# Altium PCB Switch_Matrix_32_2.PCBDOC (part 8 of 9)
Units mm, origin at the board's own origin, x right, y up, seen from the top; angles counter-clockwise.
Board outline 222.54 x 100 mm, 6 copper layers (L1, P2, L3, P4, L5, L6), stack 1.61 mm thick; 629 components, 583 nets, 2332 pads, 825 vias.
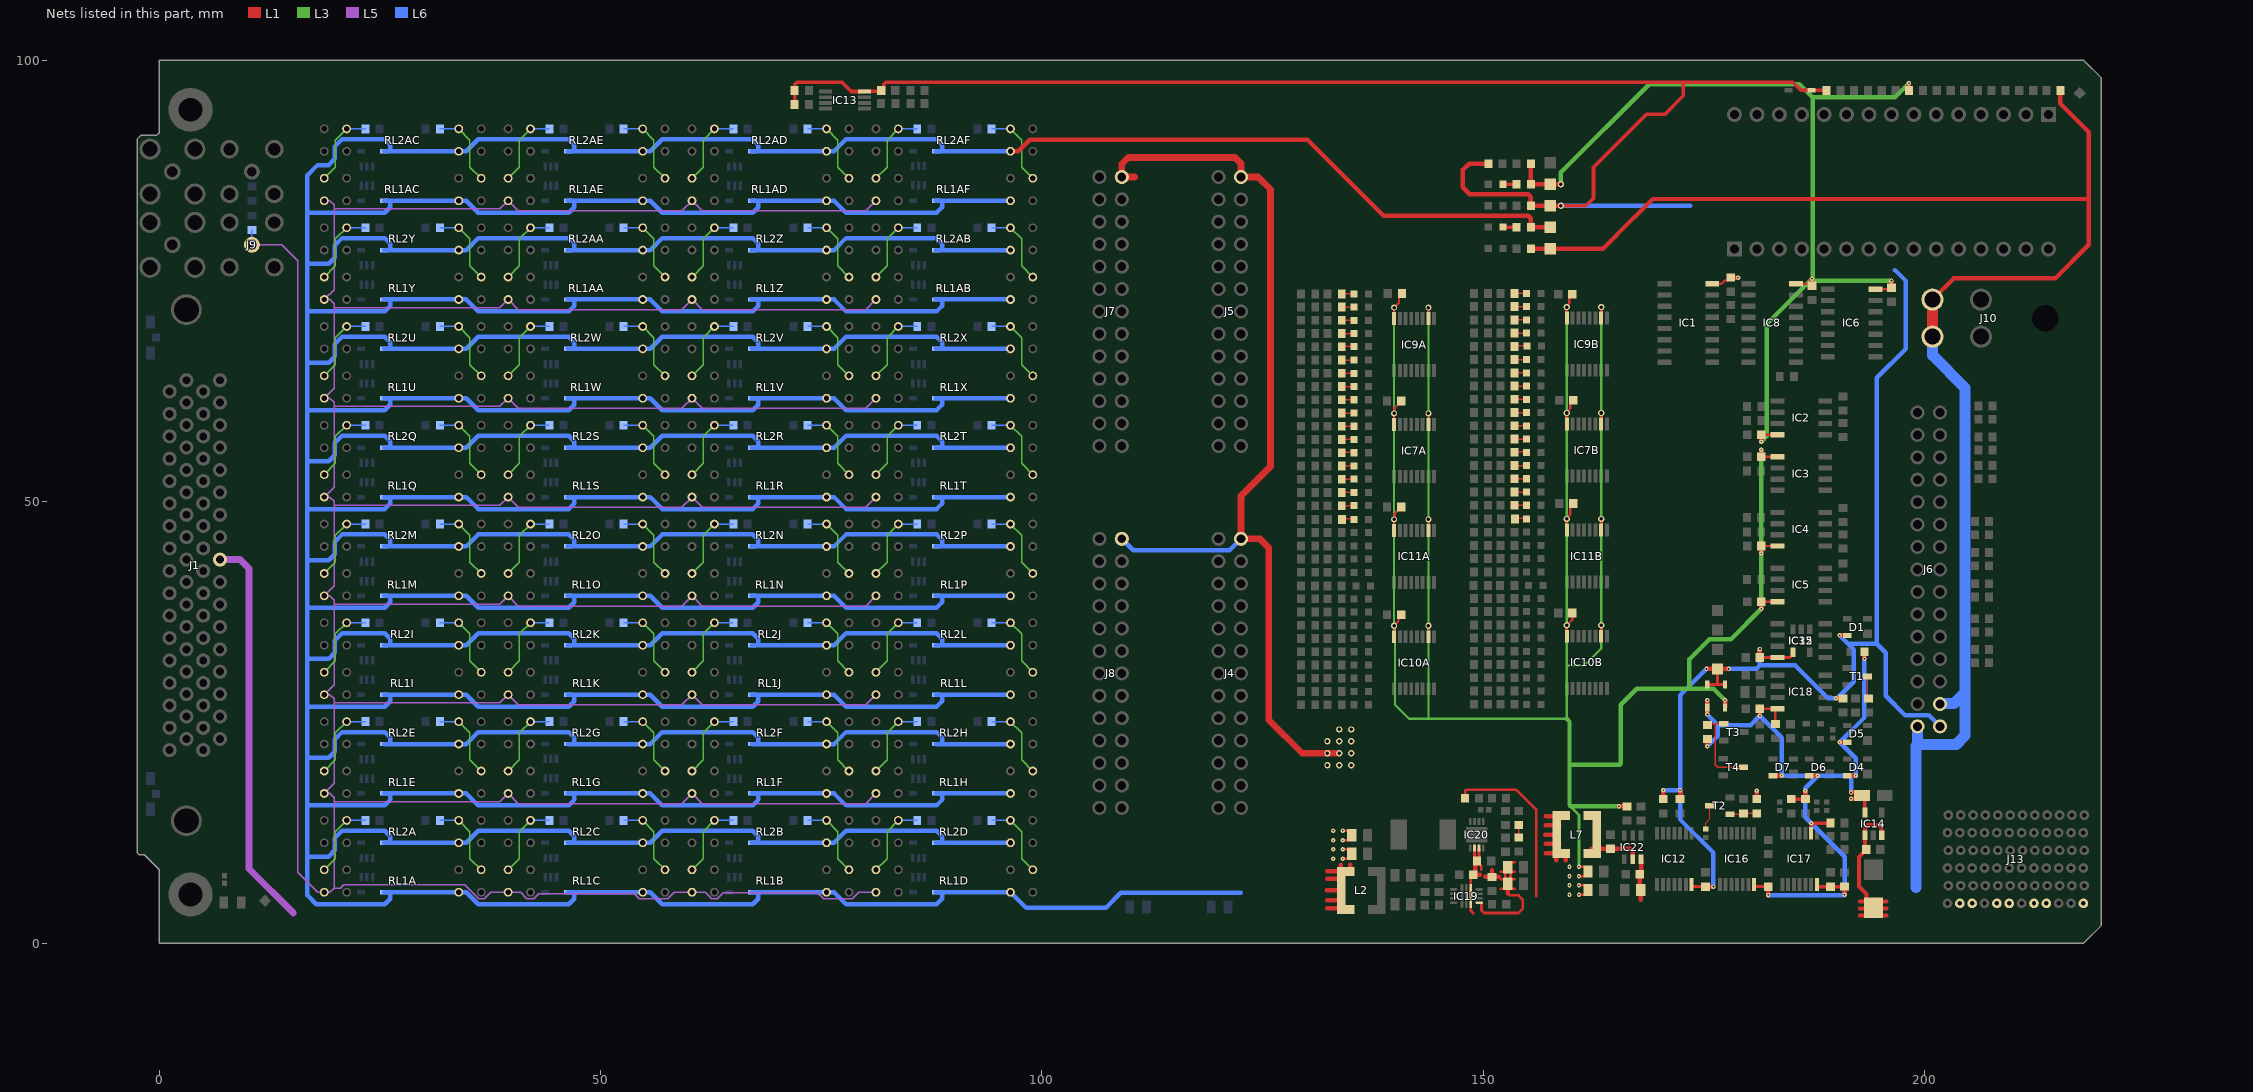
[diagram p11: the nets of this part, all layers, seen from the top]

## Via types
v1: diameter 0.5, hole 0.2, L1 to L6, tented both sides, 775 vias
v2: diameter 0.7, hole 0.4, L1 to L6, tented both sides, 41 vias
v3: diameter 0.5, hole 0.2, L1 to L6, 5 vias
v4: diameter 0.6, hole 0.3, L1 to L6, tented both sides, 4 vias

## Nets (pads, with @x,y where several pads share a name; then routed paths per layer and width w, separated by ;. In a path a pad name is that pad's centre, name@x,y a point inside that pad or via, vN(x,y) a via of type N, cw(c..) or ccw(c..) an arc to the next point about the centre after c; other vN are vias at no path point) (continued)
NetLD19A_2: LD19A.2 R32A.2 | length 1.4
  L1 w0.152: R32A.2@133.975,48.05 LD19A.2@135.35,48.05
NetLD19B_2: LD19B.2 R32B.2 | length 1.4
  L1 w0.152: R32B.2@153.55,48.1 LD19B.2@154.925,48.1
NetLD20A_2: LD20A.2 R34A.2 | length 1.4
  L1 w0.152: R34A.2@133.975,49.55 LD20A.2@135.35,49.55
NetLD20B_2: LD20B.2 R34B.2 | length 1.4
  L1 w0.152: R34B.2@153.55,49.6 LD20B.2@154.925,49.6
NetLD21A_2: LD21A.2 R36A.2 | length 1.4
  L1 w0.152: R36A.2@133.975,51.05 LD21A.2@135.35,51.05
NetLD21B_2: LD21B.2 R36B.2 | length 1.4
  L1 w0.152: R36B.2@153.55,51.1 LD21B.2@154.925,51.1
NetLD22A_2: LD22A.2 R38A.2 | length 1.4
  L1 w0.152: R38A.2@133.975,52.55 LD22A.2@135.35,52.55
NetLD22B_2: LD22B.2 R38B.2 | length 1.4
  L1 w0.152: R38B.2@153.55,52.6 LD22B.2@154.925,52.6
NetLD23A_2: LD23A.2 R40A.2 | length 1.4
  L1 w0.152: R40A.2@133.975,54.05 LD23A.2@135.35,54.05
NetLD23B_2: LD23B.2 R40B.2 | length 1.4
  L1 w0.152: R40B.2@153.55,54.1 LD23B.2@154.925,54.1
NetLD24A_2: LD24A.2 R42A.2 | length 1.4
  L1 w0.152: R42A.2@133.975,55.55 134.025,55.6 LD24A.2@135.375,55.6
NetLD24B_2: LD24B.2 R42B.2 | length 1.4
  L1 w0.152: R42B.2@153.55,55.6 153.6,55.65 LD24B.2@154.95,55.65
NetLD25A_2: LD25A.2 R44A.2 | length 1.4
  L1 w0.152: R44A.2@133.975,57.05 LD25A.2@135.35,57.05
NetLD25B_2: LD25B.2 R44B.2 | length 1.4
  L1 w0.152: R44B.2@153.55,57.1 LD25B.2@154.925,57.1
NetLD26A_2: LD26A.2 R46A.2 | length 1.4
  L1 w0.152: R46A.2@133.975,58.55 LD26A.2@135.35,58.55
NetLD26B_2: LD26B.2 R46B.2 | length 1.4
  L1 w0.152: R46B.2@153.55,58.6 LD26B.2@154.925,58.6
NetLD27A_2: LD27A.2 R48A.2 | length 1.4
  L1 w0.152: R48A.2@133.975,60.05 LD27A.2@135.35,60.05
NetLD27B_2: LD27B.2 R48B.2 | length 1.4
  L1 w0.152: R48B.2@153.55,60.1 LD27B.2@154.925,60.1
NetLD28A_2: LD28A.2 R50A.2 | length 1.4
  L1 w0.152: R50A.2@133.975,61.55 LD28A.2@135.35,61.55
NetLD28B_2: LD28B.2 R50B.2 | length 1.4
  L1 w0.152: R50B.2@153.55,61.6 LD28B.2@154.925,61.6
NetLD29A_2: LD29A.2 R52A.2 | length 1.4
  L1 w0.152: R52A.2@133.975,63.05 LD29A.2@135.35,63.05
NetLD29B_2: LD29B.2 R52B.2 | length 1.4
  L1 w0.152: R52B.2@153.55,63.1 LD29B.2@154.925,63.1
NetLD30A_2: LD30A.2 R54A.2 | length 1.4
  L1 w0.152: R54A.2@133.975,64.55 LD30A.2@135.35,64.55
NetLD30B_2: LD30B.2 R54B.2 | length 1.4
  L1 w0.152: R54B.2@153.55,64.6 LD30B.2@154.925,64.6
NetLD31A_2: LD31A.2 R57A.2 | length 1.4
  L1 w0.152: R57A.2@133.975,66.05 LD31A.2@135.35,66.05
NetLD31B_2: LD31B.2 R57B.2 | length 1.4
  L1 w0.152: R57B.2@153.55,66.1 LD31B.2@154.925,66.1
NetLD32A_2: LD32A.2 R59A.2 | length 1.4
  L1 w0.152: R59A.2@133.975,67.55 134.025,67.6 LD32A.2@135.375,67.6
NetLD32B_2: LD32B.2 R59B.2 | length 1.4
  L1 w0.152: R59B.2@153.55,67.6 153.6,67.65 LD32B.2@154.95,67.65
NetLD33A_2: LD33A.2 R61A.2 | length 1.4
  L1 w0.152: R61A.2@133.975,69.05 LD33A.2@135.35,69.05
NetLD33B_2: LD33B.2 R61B.2 | length 1.4
  L1 w0.152: R61B.2@153.55,69.1 LD33B.2@154.925,69.1
NetLD34A_2: LD34A.2 R63A.2 | length 1.4
  L1 w0.152: R63A.2@133.975,70.55 LD34A.2@135.35,70.55
NetLD34B_2: LD34B.2 R63B.2 | length 1.4
  L1 w0.152: R63B.2@153.55,70.6 LD34B.2@154.925,70.6
NetLD35A_2: LD35A.2 R65A.2 | length 1.4
  L1 w0.152: R65A.2@133.975,72.05 LD35A.2@135.35,72.05
NetLD35B_2: LD35B.2 R65B.2 | length 1.4
  L1 w0.152: R65B.2@153.55,72.1 LD35B.2@154.925,72.1
NetLD36A_2: LD36A.2 R67A.2 | length 1.4
  L1 w0.152: R67A.2@133.975,73.55 LD36A.2@135.35,73.55
NetLD36B_2: LD36B.2 R67B.2 | length 1.4
  L1 w0.152: R67B.2@153.55,73.6 LD36B.2@154.925,73.6
NetLD37_2: LD37.2 R125.2 | length 1.6
  L1 w0.4: LD37.2@152.225,81.1 R125.2@153.8,81.1
NetLD38_2: LD38.2 R127.2 | length 1.6
  L1 w0.4: LD38.2@152.225,85.967 R127.2@153.8,85.967
NetR85_1: R85.1 T2.3 | length 2.8
  L1 w0.127: R85.1@175.2,12.9 175.2,13.6 175.659,14.059 T2.3@175.659,15.548
NetR98A_2: R98A.2 RL1A.8 RL2A.7 | length 8.8
  L3 w0.152: RL1A.8@18.694,8.3 19.971,9.577 19.971,12.633 RL2A.7@21.234,13.896
  L6 w0.152: RL2A.7@21.234,13.896 R98A.2@23.378,13.896
NetR98AA_2: R98AA.2 RL1AA.8 RL2AA.7 | length 8.8
  L3 w0.152: RL1AA.8@39.53,75.452 40.807,76.729 40.807,79.785 RL2AA.7@42.07,81.048
  L6 w0.152: RL2AA.7@42.07,81.048 R98AA.2@44.214,81.048
NetR98AB_2: R98AB.2 RL1AB.8 RL2AB.7 | length 8.8
  L3 w0.152: RL1AB.8@81.202,75.452 82.479,76.729 82.479,79.785 RL2AB.7@83.742,81.048
  L6 w0.152: RL2AB.7@83.742,81.048 R98AB.2@85.886,81.048
NetR98AC_2: R98AC.2 RL1AC.8 RL2AC.7 | length 8.8
  L3 w0.152: RL1AC.8@18.694,86.644 19.971,87.921 19.971,90.977 RL2AC.7@21.234,92.24
  L6 w0.152: RL2AC.7@21.234,92.24 R98AC.2@23.378,92.24
NetR98AD_2: R98AD.2 RL1AD.8 RL2AD.7 | length 8.8
  L3 w0.152: RL1AD.8@60.366,86.644 61.643,87.921 61.643,90.977 RL2AD.7@62.906,92.24
  L6 w0.152: RL2AD.7@62.906,92.24 R98AD.2@65.05,92.24
NetR98AE_2: R98AE.2 RL1AE.8 RL2AE.7 | length 8.8
  L3 w0.152: RL1AE.8@39.53,86.644 40.807,87.921 40.807,90.977 RL2AE.7@42.07,92.24
  L6 w0.152: RL2AE.7@42.07,92.24 R98AE.2@44.214,92.24
NetR98AF_2: R98AF.2 RL1AF.8 RL2AF.7 | length 8.8
  L3 w0.152: RL1AF.8@81.202,86.644 82.479,87.921 82.479,90.977 RL2AF.7@83.742,92.24
  L6 w0.152: RL2AF.7@83.742,92.24 R98AF.2@85.886,92.24
NetR98B_2: R98B.2 RL1B.8 RL2B.7 | length 8.8
  L3 w0.152: RL1B.8@60.366,8.3 61.643,9.577 61.643,12.633 RL2B.7@62.906,13.896
  L6 w0.152: RL2B.7@62.906,13.896 R98B.2@65.05,13.896
NetR98C_2: R98C.2 RL1C.8 RL2C.7 | length 8.8
  L3 w0.152: RL1C.8@39.53,8.3 40.807,9.577 40.807,12.633 RL2C.7@42.07,13.896
  L6 w0.152: RL2C.7@42.07,13.896 R98C.2@44.214,13.896
NetR98D_2: R98D.2 RL1D.8 RL2D.7 | length 8.8
  L3 w0.152: RL1D.8@81.202,8.3 82.479,9.577 82.479,12.633 RL2D.7@83.742,13.896
  L6 w0.152: RL2D.7@83.742,13.896 R98D.2@85.886,13.896
NetR98E_2: R98E.2 RL1E.8 RL2E.7 | length 8.8
  L3 w0.152: RL1E.8@18.694,19.492 19.971,20.769 19.971,23.825 RL2E.7@21.234,25.088
  L6 w0.152: RL2E.7@21.234,25.088 R98E.2@23.378,25.088
NetR98F_2: R98F.2 RL1F.8 RL2F.7 | length 8.8
  L3 w0.152: RL1F.8@60.366,19.492 61.643,20.769 61.643,23.825 RL2F.7@62.906,25.088
  L6 w0.152: RL2F.7@62.906,25.088 R98F.2@65.05,25.088
NetR98G_2: R98G.2 RL1G.8 RL2G.7 | length 8.8
  L3 w0.152: RL1G.8@39.53,19.492 40.807,20.769 40.807,23.825 RL2G.7@42.07,25.088
  L6 w0.152: RL2G.7@42.07,25.088 R98G.2@44.214,25.088
NetR98H_2: R98H.2 RL1H.8 RL2H.7 | length 8.8
  L3 w0.152: RL1H.8@81.202,19.492 82.479,20.769 82.479,23.825 RL2H.7@83.742,25.088
  L6 w0.152: RL2H.7@83.742,25.088 R98H.2@85.886,25.088
NetR98I_2: R98I.2 RL1I.8 RL2I.7 | length 8.8
  L3 w0.152: RL1I.8@18.694,30.684 19.971,31.961 19.971,35.017 RL2I.7@21.234,36.28
  L6 w0.152: RL2I.7@21.234,36.28 R98I.2@23.378,36.28
NetR98J_2: R98J.2 RL1J.8 RL2J.7 | length 8.8
  L3 w0.152: RL1J.8@60.366,30.684 61.643,31.961 61.643,35.017 RL2J.7@62.906,36.28
  L6 w0.152: RL2J.7@62.906,36.28 R98J.2@65.05,36.28
NetR98K_2: R98K.2 RL1K.8 RL2K.7 | length 8.8
  L3 w0.152: RL1K.8@39.53,30.684 40.807,31.961 40.807,35.017 RL2K.7@42.07,36.28
  L6 w0.152: RL2K.7@42.07,36.28 R98K.2@44.214,36.28
NetR98L_2: R98L.2 RL1L.8 RL2L.7 | length 8.8
  L3 w0.152: RL1L.8@81.202,30.684 82.479,31.961 82.479,35.017 RL2L.7@83.742,36.28
  L6 w0.152: RL2L.7@83.742,36.28 R98L.2@85.886,36.28
NetR98M_2: R98M.2 RL1M.8 RL2M.7 | length 8.8
  L3 w0.152: RL1M.8@18.694,41.876 19.971,43.153 19.971,46.209 RL2M.7@21.234,47.472
  L6 w0.152: RL2M.7@21.234,47.472 22.734,47.472 R98M.2@23.378,47.472
NetR98N_2: R98N.2 RL1N.8 RL2N.7 | length 8.8
  L3 w0.152: RL1N.8@60.366,41.876 61.643,43.153 61.643,46.209 RL2N.7@62.906,47.472
  L6 w0.152: RL2N.7@62.906,47.472 R98N.2@65.05,47.472
NetR98O_2: R98O.2 RL1O.8 RL2O.7 | length 8.8
  L3 w0.152: RL1O.8@39.53,41.876 40.807,43.153 40.807,46.209 RL2O.7@42.07,47.472
  L6 w0.152: RL2O.7@42.07,47.472 R98O.2@44.214,47.472
NetR98P_2: R98P.2 RL1P.8 RL2P.7 | length 8.8
  L3 w0.152: RL1P.8@81.202,41.876 82.479,43.153 82.479,46.209 RL2P.7@83.742,47.472
  L6 w0.152: RL2P.7@83.742,47.472 R98P.2@85.886,47.472
NetR98Q_2: R98Q.2 RL1Q.8 RL2Q.7 | length 8.8
  L3 w0.152: RL1Q.8@18.694,53.068 19.971,54.345 19.971,57.401 RL2Q.7@21.234,58.664
  L6 w0.152: RL2Q.7@21.234,58.664 R98Q.2@23.378,58.664
NetR98R_2: R98R.2 RL1R.8 RL2R.7 | length 8.8
  L3 w0.152: RL1R.8@60.366,53.068 61.643,54.345 61.643,57.401 RL2R.7@62.906,58.664
  L6 w0.152: RL2R.7@62.906,58.664 R98R.2@65.05,58.664
NetR98S_2: R98S.2 RL1S.8 RL2S.7 | length 8.8
  L3 w0.152: RL1S.8@39.53,53.068 40.807,54.345 40.807,57.401 RL2S.7@42.07,58.664
  L6 w0.152: RL2S.7@42.07,58.664 R98S.2@44.214,58.664
NetR98T_2: R98T.2 RL1T.8 RL2T.7 | length 8.8
  L3 w0.152: RL1T.8@81.202,53.068 82.479,54.345 82.479,57.401 RL2T.7@83.742,58.664
  L6 w0.152: RL2T.7@83.742,58.664 R98T.2@85.886,58.664
NetR98U_2: R98U.2 RL1U.8 RL2U.7 | length 8.8
  L3 w0.152: RL1U.8@18.694,64.26 19.971,65.537 19.971,68.593 RL2U.7@21.234,69.856
  L6 w0.152: RL2U.7@21.234,69.856 R98U.2@23.378,69.856
NetR98V_2: R98V.2 RL1V.8 RL2V.7 | length 8.8
  L3 w0.152: RL1V.8@60.366,64.26 61.643,65.537 61.643,68.593 RL2V.7@62.906,69.856
  L6 w0.152: RL2V.7@62.906,69.856 R98V.2@65.05,69.856
NetR98W_2: R98W.2 RL1W.8 RL2W.7 | length 8.8
  L3 w0.152: RL1W.8@39.53,64.26 40.807,65.537 40.807,68.593 RL2W.7@42.07,69.856
  L6 w0.152: RL2W.7@42.07,69.856 R98W.2@44.214,69.856
NetR98X_2: R98X.2 RL1X.8 RL2X.7 | length 8.8
  L3 w0.152: RL1X.8@81.202,64.26 82.479,65.537 82.479,68.593 RL2X.7@83.742,69.856
  L6 w0.152: RL2X.7@83.742,69.856 R98X.2@85.886,69.856
NetR98Y_2: R98Y.2 RL1Y.8 RL2Y.7 | length 8.8
  L3 w0.152: RL1Y.8@18.694,75.452 19.971,76.729 19.971,79.785 RL2Y.7@21.234,81.048
  L6 w0.152: RL2Y.7@21.234,81.048 R98Y.2@23.378,81.048
NetR98Z_2: R98Z.2 RL1Z.8 RL2Z.7 | length 8.8
  L3 w0.152: RL1Z.8@60.366,75.452 61.643,76.729 61.643,79.785 RL2Z.7@62.906,81.048
  L6 w0.152: RL2Z.7@62.906,81.048 R98Z.2@65.05,81.048
NetR99A_2: R99A.2 RL1A.5 RL2A.6 | length 8.8
  L3 w0.152: RL2A.6@33.934,13.896 35.197,12.633 35.197,9.577 RL1A.5@36.474,8.3
  L6 w0.152: R99A.2@31.79,13.896 RL2A.6@33.934,13.896
NetR99AA_2: R99AA.2 RL1AA.5 RL2AA.6 | length 8.8
  L3 w0.152: RL2AA.6@54.77,81.048 56.033,79.785 56.033,76.729 RL1AA.5@57.31,75.452
  L6 w0.152: R99AA.2@52.626,81.048 RL2AA.6@54.77,81.048
NetR99AB_2: R99AB.2 RL1AB.5 RL2AB.6 | length 8.8
  L3 w0.152: RL2AB.6@96.442,81.048 97.705,79.785 97.705,76.729 RL1AB.5@98.982,75.452
  L6 w0.152: R99AB.2@94.298,81.048 RL2AB.6@96.442,81.048
NetR99AC_2: R99AC.2 RL1AC.5 RL2AC.6 | length 8.8
  L3 w0.152: RL2AC.6@33.934,92.24 35.197,90.977 35.197,87.921 RL1AC.5@36.474,86.644
  L6 w0.152: R99AC.2@31.79,92.24 RL2AC.6@33.934,92.24
NetR99AD_2: R99AD.2 RL1AD.5 RL2AD.6 | length 8.8
  L3 w0.152: RL2AD.6@75.606,92.24 76.869,90.977 76.869,87.921 RL1AD.5@78.146,86.644
  L6 w0.152: R99AD.2@73.462,92.24 RL2AD.6@75.606,92.24
NetR99AE_2: R99AE.2 RL1AE.5 RL2AE.6 | length 8.8
  L3 w0.152: RL2AE.6@54.77,92.24 56.033,90.977 56.033,87.921 RL1AE.5@57.31,86.644
  L6 w0.152: R99AE.2@52.626,92.24 RL2AE.6@54.77,92.24
NetR99AF_2: R99AF.2 RL1AF.5 RL2AF.6 | length 8.8
  L3 w0.152: RL2AF.6@96.442,92.24 97.705,90.977 97.705,87.921 RL1AF.5@98.982,86.644
  L6 w0.152: R99AF.2@94.298,92.24 RL2AF.6@96.442,92.24
NetR99B_2: R99B.2 RL1B.5 RL2B.6 | length 8.8
  L3 w0.152: RL2B.6@75.606,13.896 76.869,12.633 76.869,9.577 RL1B.5@78.146,8.3
  L6 w0.152: R99B.2@73.462,13.896 RL2B.6@75.606,13.896
NetR99C_2: R99C.2 RL1C.5 RL2C.6 | length 8.8
  L3 w0.152: RL2C.6@54.77,13.896 56.033,12.633 56.033,9.577 RL1C.5@57.31,8.3
  L6 w0.152: R99C.2@52.626,13.896 RL2C.6@54.77,13.896
NetR99D_2: R99D.2 RL1D.5 RL2D.6 | length 8.8
  L3 w0.152: RL2D.6@96.442,13.896 97.705,12.633 97.705,9.577 RL1D.5@98.982,8.3
  L6 w0.152: R99D.2@94.298,13.896 RL2D.6@96.442,13.896
NetR99E_2: R99E.2 RL1E.5 RL2E.6 | length 8.8
  L3 w0.152: RL2E.6@33.934,25.088 35.197,23.825 35.197,20.769 RL1E.5@36.474,19.492
  L6 w0.152: R99E.2@31.79,25.088 RL2E.6@33.934,25.088
NetR99F_2: R99F.2 RL1F.5 RL2F.6 | length 8.8
  L3 w0.152: RL2F.6@75.606,25.088 76.869,23.825 76.869,20.769 RL1F.5@78.146,19.492
  L6 w0.152: R99F.2@73.462,25.088 RL2F.6@75.606,25.088
NetR99G_2: R99G.2 RL1G.5 RL2G.6 | length 8.8
  L3 w0.152: RL2G.6@54.77,25.088 56.033,23.825 56.033,20.769 RL1G.5@57.31,19.492
  L6 w0.152: R99G.2@52.626,25.088 RL2G.6@54.77,25.088
NetR99H_2: R99H.2 RL1H.5 RL2H.6 | length 8.8
  L3 w0.152: RL2H.6@96.442,25.088 97.705,23.825 97.705,20.769 RL1H.5@98.982,19.492
  L6 w0.152: R99H.2@94.298,25.088 RL2H.6@96.442,25.088
NetR99I_2: R99I.2 RL1I.5 RL2I.6 | length 8.8
  L3 w0.152: RL2I.6@33.934,36.28 35.197,35.017 35.197,31.961 RL1I.5@36.474,30.684
  L6 w0.152: R99I.2@31.79,36.28 RL2I.6@33.934,36.28
NetR99J_2: R99J.2 RL1J.5 RL2J.6 | length 8.8
  L3 w0.152: RL2J.6@75.606,36.28 76.869,35.017 76.869,31.961 RL1J.5@78.146,30.684
  L6 w0.152: R99J.2@73.462,36.28 RL2J.6@75.606,36.28
NetR99K_2: R99K.2 RL1K.5 RL2K.6 | length 8.8
  L3 w0.152: RL2K.6@54.77,36.28 56.033,35.017 56.033,31.961 RL1K.5@57.31,30.684
  L6 w0.152: R99K.2@52.626,36.28 RL2K.6@54.77,36.28
NetR99L_2: R99L.2 RL1L.5 RL2L.6 | length 8.8
  L3 w0.152: RL2L.6@96.442,36.28 97.705,35.017 97.705,31.961 RL1L.5@98.982,30.684
  L6 w0.152: R99L.2@94.298,36.28 RL2L.6@96.442,36.28
NetR99M_2: R99M.2 RL1M.5 RL2M.6 | length 8.8
  L3 w0.152: RL2M.6@33.934,47.472 35.197,46.209 35.197,43.153 RL1M.5@36.474,41.876
  L6 w0.152: R99M.2@31.79,47.472 RL2M.6@33.934,47.472
NetR99N_2: R99N.2 RL1N.5 RL2N.6 | length 8.8
  L3 w0.152: RL2N.6@75.606,47.472 76.869,46.209 76.869,43.153 RL1N.5@78.146,41.876
  L6 w0.152: R99N.2@73.462,47.472 RL2N.6@75.606,47.472
NetR99O_2: R99O.2 RL1O.5 RL2O.6 | length 8.8
  L3 w0.152: RL2O.6@54.77,47.472 56.033,46.209 56.033,43.153 RL1O.5@57.31,41.876
  L6 w0.152: R99O.2@52.626,47.472 RL2O.6@54.77,47.472
NetR99P_2: R99P.2 RL1P.5 RL2P.6 | length 8.8
  L3 w0.152: RL2P.6@96.442,47.472 97.705,46.209 97.705,43.153 RL1P.5@98.982,41.876
  L6 w0.152: R99P.2@94.298,47.472 RL2P.6@96.442,47.472
NetR99Q_2: R99Q.2 RL1Q.5 RL2Q.6 | length 8.8
  L3 w0.152: RL2Q.6@33.934,58.664 35.197,57.401 35.197,54.345 RL1Q.5@36.474,53.068
  L6 w0.152: R99Q.2@31.79,58.664 RL2Q.6@33.934,58.664
NetR99R_2: R99R.2 RL1R.5 RL2R.6 | length 8.8
  L3 w0.152: RL2R.6@75.606,58.664 76.869,57.401 76.869,54.345 RL1R.5@78.146,53.068
  L6 w0.152: R99R.2@73.462,58.664 RL2R.6@75.606,58.664
NetR99S_2: R99S.2 RL1S.5 RL2S.6 | length 8.8
  L3 w0.152: RL2S.6@54.77,58.664 56.033,57.401 56.033,54.345 RL1S.5@57.31,53.068
  L6 w0.152: R99S.2@52.626,58.664 RL2S.6@54.77,58.664
NetR99T_2: R99T.2 RL1T.5 RL2T.6 | length 8.8
  L3 w0.152: RL2T.6@96.442,58.664 97.705,57.401 97.705,54.345 RL1T.5@98.982,53.068
  L6 w0.152: R99T.2@94.298,58.664 RL2T.6@96.442,58.664
NetR99U_2: R99U.2 RL1U.5 RL2U.6 | length 8.8
  L3 w0.152: RL2U.6@33.934,69.856 35.197,68.593 35.197,65.537 RL1U.5@36.474,64.26
  L6 w0.152: R99U.2@31.79,69.856 RL2U.6@33.934,69.856
NetR99V_2: R99V.2 RL1V.5 RL2V.6 | length 8.8
  L3 w0.152: RL2V.6@75.606,69.856 76.869,68.593 76.869,65.537 RL1V.5@78.146,64.26
  L6 w0.152: R99V.2@73.462,69.856 RL2V.6@75.606,69.856
NetR99W_2: R99W.2 RL1W.5 RL2W.6 | length 8.8
  L3 w0.152: RL2W.6@54.77,69.856 56.033,68.593 56.033,65.537 RL1W.5@57.31,64.26
  L6 w0.152: R99W.2@52.626,69.856 RL2W.6@54.77,69.856
NetR99X_2: R99X.2 RL1X.5 RL2X.6 | length 8.8
  L3 w0.152: RL2X.6@96.442,69.856 97.705,68.593 97.705,65.537 RL1X.5@98.982,64.26
  L6 w0.152: R99X.2@94.298,69.856 RL2X.6@96.442,69.856
NetR99Y_2: R99Y.2 RL1Y.5 RL2Y.6 | length 8.8
  L3 w0.152: RL2Y.6@33.934,81.048 35.197,79.785 35.197,76.729 RL1Y.5@36.474,75.452
  L6 w0.152: R99Y.2@31.79,81.048 RL2Y.6@33.934,81.048
NetR99Z_2: R99Z.2 RL1Z.5 RL2Z.6 | length 8.8
  L3 w0.152: RL2Z.6@75.606,81.048 76.869,79.785 76.869,76.729 RL1Z.5@78.146,75.452
  L6 w0.152: R99Z.2@73.462,81.048 RL2Z.6@75.606,81.048
NetR103_1: R103.1 R104.2 T2.1 | length 3.1
  L1 w0.152: T2.1@177.959,14.598 179.398,14.598 R104.2@179.5,14.7 R103.1@181,14.7
NetR113_1: R113.1 T1.3 | length 2.5
  L1 w0.127: T1.3@193.55,30.2 193.55,27.829 R113.1@193.65,27.729
NetR115_1: R115.1 T3.1 T4.3 | length 9.9
  L1 w0.152: R115.1@175.4,24.7 175.55,24.85 176.317,24.85 ; T3.1@177.25,24.85 176.317,24.85 ; T4.3@179.5,19.925 176.575,19.925 176.3,20.2 176.3,24.833 176.317,24.85
NetR123_1: R123.1 R124.2 | length 1.4
  L1 w0.152: R124.2@154.03,11.95 R123.1@154.03,13.35
P3V3: C1.2 C2.2 C3.2 C8.2 C9.2 C10.2 C18A.2 C18B.2 C19A.2 C19B.2 C20A.2 C20B.2 C21A.2 C21B.2 C58.2 C110.2 C121.2 D2.2 IC1.16 IC2.8 IC3.1 IC4.8 IC5.8 IC6.14 IC7A.10 IC7A.16 IC7B.10 IC7B.16 IC8.16 IC9A.10 IC9A.16 IC9B.10 IC9B.16 IC10A.10 IC10A.16 IC10B.10 IC10B.16 IC11A.10 IC11A.16 IC11B.10 IC11B.16 L7.2 R16.2 R19.2 R103.2 R127.1 R159.1 TP11.1 | length 453.3
  L1 w0.254: IC10A.16@139.9,34.7 v2(139.9,35.95) 140.417,36.467 140.417,36.917 C21B.2@140.7,37.2 ; IC11A.16@139.9,46.75 v2(139.9,48) 139.985,48.085 139.985,48.66 140.7,49.375 C21A.2@140.7,49.4 ; IC7A.16@139.9,58.75 v2(139.9,60) 139.985,60.085 139.985,60.66 140.7,61.375 C20B.2@140.7,61.4 ; IC9A.16@139.9,70.75 v2(139.9,72) 140.452,72.552 140.452,73.252 C19B.2@140.8,73.6 ; IC10A.10@143.8,34.7 v2(143.8,35.95) ; IC11A.10@143.8,46.75 v2(143.8,48) ; IC7A.10@143.8,58.75 v2(143.8,60) ; IC9A.10@143.8,70.75 v2(143.8,72) ; IC10B.16@159.475,34.75 v2(159.475,36) 160.1,36.625 C20A.2@160.1,37.4 ; IC11B.16@159.475,46.8 v2(159.475,48.05) 159.475,48.171 159.852,48.548 159.852,49.452 C19A.2@160.2,49.8 ; IC7B.16@159.475,58.8 v2(159.475,60.05) 159.475,60.171 159.852,60.548 159.852,61.152 C18B.2@160.2,61.5 ; IC9B.16@159.475,70.8 v2(159.475,72.05) 159.475,72.171 159.752,72.448 159.752,73.152 C18A.2@160.1,73.5 ; C110.2@161.875,5.993 C110.2@162.273,5.595 ; IC10B.10@163.375,34.75 v2(163.375,36) ; IC11B.10@163.375,46.8 v2(163.375,48.05) ; IC7B.10@163.375,58.8 v2(163.375,60.05) ; IC9B.10@163.375,70.8 v2(163.375,72.05) ; IC1.16@175.95,74.695 176.997,74.695 177.373,75.071 177.721,75.071 C2.2@178.05,75.4 ; C58.2@181.501,38.66 IC5.8@183.351,38.66 ; C10.2@181.501,44.97 IC4.8@183.351,44.97 ; C1.2@181.501,55.1 IC3.1@183.351,55.1 ; C8.2@181.501,57.595 IC2.8@183.351,57.595 ; IC8.16@185.45,74.695 187.005,74.695 C9.2@187.25,74.45 ; IC6.14@194.45,74.06 196.06,74.06 C3.2@196.25,74.25
  L1 w0.3: v1@160.895,5.468 C110.2@161.444,5.468 ; v1@160.895,6.549 C110.2@161.444,6.549 ; v1@160.895,7.568 C121.2@161.444,7.568 ; v1@160.895,8.649 C121.2@161.444,8.649
  L1 w0.508: R159.1@155.4,88.3 R127.1@155.4,85.967 TP11.1@157.6,85.967 v2(158.8,85.967) ; 157.025,12.293 L7.2@158.325,12.293 L7.2@158.525,12.293 ; 157.096,11.247 L7.2@158.596,11.247 ; 157.096,14.385 L7.2@158.596,14.385 ; 157.1,10.201 L7.2@158.6,10.201 ; 157.1,13.339 L7.2@158.6,13.339 ; 158.263,9.386 L7.2@158.263,10.106 ; 159.338,9.381 L7.2@159.338,10.38 ; v1(165.385,15.493) R16.2@166.3,15.493 ; D2.2@177.4,26.7 v1(177.4,27.5) ; C2.2@178.068,75.382 v1(178.882,75.382) ; R103.2@181,16.35 v1(181,17.265) ; v1(181.501,37.86) C58.2@181.501,38.66 ; v1(181.501,44.17) C10.2@181.501,44.97 ; C1.2@181.501,55.1 v1(181.501,55.9) ; v1(181.501,56.795) C8.2@181.501,57.595 ; C9.2@187.25,74.45 v1(187.25,75.25) ; C3.2@196.25,74.25 v1(196.25,75.05) ; R19.2@198.237,96.6 v1(198.237,97.4)
  L3 w0.254: 139.9,36.3 v2(139.9,60) v2(139.9,72) ; v2@140,36.2 140,27 141.6,25.4 143.8,25.4 ; v2(143.8,72) v2(143.8,60) v2(143.8,35.95) 143.8,25.4 ; v2(159.475,72.05) v2(159.475,60.05) v2(159.475,36) 159.475,31.449 ; v2(163.375,72.05) v2(163.375,60.05) v2(163.375,36) 163.375,33.375 161.449,31.449 159.475,31.449 ; 143.8,25.4 159.475,25.4 159.475,31.449
  L3 w0.3: 159.78,15.586 159.873,15.493 160.86,14.506 v1(160.86,8.649)
  L3 w0.508: v2(158.8,85.967) 158.8,87.3 168.8,97.3 185.833,97.3 187.333,95.8 187.36,95.8 ; 159.475,25.4 159.78,25.095 159.78,20.212 ; 159.78,15.586 159.78,20.212 ; 159.873,15.493 v1(165.385,15.493) ; v1(177.4,27.5) 176.1,28.8 173.334,28.8 ; v1(181.501,55.9) v1(181.501,37.86) 178.042,34.4 175.6,34.4 173.334,32.134 173.334,28.8 ; v1(181.501,56.795) 182.1,57.394 182.1,70.1 v1(187.25,75.25) ; v1(196.25,75.05) 187.45,75.05 v1(187.25,75.25) ; v1(198.237,97.4) 196.637,95.8 187.36,95.8 ; 159.78,20.212 165.47,20.212 165.6,20.342 165.6,27 167.4,28.8 173.334,28.8 ; v1(187.25,75.25) 187.36,75.36 187.36,95.8
  other v1: 159.78,5.468 160.86,5.468 159.78,6.549 160.86,6.549 159.78,7.568 160.86,7.568 159.78,8.649
P3V3_DIOT: C22.2 C23.1 C24.2 C26.2 D4.4 D5.4 D6.4 D7.4 D11.2 IC14.5 IC16.14 IC17.2 IC17.14 IC18.8 R105.2 R106.1 R109.1 R111.1 R112.1 R115.2 R116.1 | length 96
  L1 w0.152: C26.2@181.451,26.45 C26.2@181.546,26.545
  L1 w0.3: IC16.14@180.709,6.648 180.709,6.475 180.784,6.4 C22.2@182.299,6.4 ; C26.2@181.351,26.545 181.546,26.545 IC18.8@183.1,26.545 ; R116.1@183.1,24.8 IC18.8@183.1,26.545 ; IC18.8@183.351,26.545 IC18.8@183.1,26.545
  L1 w0.4: R111.1@184.9,16.3 186.45,16.3 R109.1@186.5,16.35 ; IC17.2@187.158,12.431 v1(187.158,13.579) 187.168,13.589 189.339,13.589 R105.2@189.35,13.6 ; IC17.14@187.808,6.631 187.808,6.429 187.837,6.4 R106.1@190.95,6.4 ; C23.1@192.9,16.7 193.25,16.35 IC14.5@193.25,14.8
  L1 w0.508: v1(175.4,22.3) R115.2@175.4,23.1 ; v1(175.4,25.9) D11.2@175.4,26.7 v1(175.4,27.5) ; v1(181.351,25.745) C26.2@181.351,26.545 C26.2@181.351,26.745 ; v1(182.299,5.435) C22.2@182.299,6.35 ; D7.4@182.9,18.95 v1(183.815,18.95) ; R109.1@186.5,16.35 v1(186.5,17.265) ; D6.4@187,18.95 v1(187.915,18.95) ; v1(190.401,22.75) D5.4@191.201,22.75 ; v1(190.95,5.485) R106.1@190.95,6.4 ; D4.4@191.3,18.95 v1(192.215,18.95) ; v1(191.673,16.337) C23.1@192.588,16.337 ; v1(191.673,17.063) C23.1@192.588,17.063 ; v1(193.2,32.2) R112.1@193.2,33
  L6 w0.508: v1(175.4,22.3) 176.6,23.5 176.6,24.7 ; v1(175.4,25.9) 176.6,24.7 ; v1(182.299,5.435) 190.9,5.435 v1(190.95,5.485) 190.95,9.786 v1(187.158,13.579) 186.5,14.236 v1(186.5,17.265) 186.5,17.535 v1(187.915,18.95) ; v1(191.673,17.063) 191.673,18.916 191.707,18.95 ; v1(193.2,32.2) 193.2,25.549 v1(190.401,22.75) 192.215,20.936 v1(192.215,18.95) 191.707,18.95 ; 176.6,24.7 180.305,24.7 v1(181.351,25.745) 183.815,23.281 v1(183.815,18.95) v1(187.915,18.95) ; v1(187.915,18.95) 191.707,18.95
P3V3_LX: C102.2 IC22.2 L7.1 | length 5.7
  L1 w0.508: 162.235,10.682 C102.2@164.438,10.682 166.64,10.682 166.938,10.385 IC22.2@166.938,9.482
P3V3_MP: C4.2 C38.2 C47.2 D1.4 D2.1 D3.1 D11.1 IC12.14 IC13.8 IC15.8 IC32.4 J6.30 R18.2 R86.1 R93.2 R101.1 R102.1 R160.1 R175.2 R177.2 TP3.1 TP5.1 | length 307.5
  L1 w0.3: IC12.14@173.61,6.648 173.61,6.475 173.685,6.4 C4.2@175.2,6.4 ; D11.1@175.4,29.3 176.551,29.3 ; TP3.1@176.551,31.06 176.551,29.3 ; D2.1@177.4,29.3 176.551,29.3 ; C38.2@181.351,32.355 IC15.8@183.351,32.355 184.745,32.355 185.1,32.711 IC32.4@185.1,32.961
  L1 w0.4: R177.2@72,95 R175.2@72,96.6 72,97.269 72.234,97.503 77.397,97.503 78.425,96.475 IC13.8@79.9,96.475 79.925,96.5 81.6,96.5 82.075,96.975 82.075,97.305 82.309,97.539 172.684,97.539 ; v2(158.8,83.533) 161.633,83.533 162.5,84.4 162.5,87.9 168.5,93.9 170.6,93.9 172.684,95.984 172.684,97.539 ; R18.2@188.9,96.6 D3.1@187.2,96.6 186.012,96.6 185.073,97.539 172.684,97.539
  L1 w0.508: R93.2@150.6,88.3 148.409,88.3 147.7,87.591 147.7,85.626 148.492,84.833 155.1,84.833 155.4,84.533 R160.1@155.4,83.533 TP5.1@157.6,83.533 v2(158.8,83.533) ; R102.1@170.4,16.3 v1(170.4,17.3) ; R101.1@172.3,16.3 v1(172.3,17.3) ; C4.2@175.25,6.4 v1(176.084,6.4) ; v1(175.302,31.06) TP3.1@176.102,31.06 ; TP3.1@177,31.06 v1(177.8,31.06) ; C38.2@181.351,32.355 v1(181.351,33.305) ; v1@189.949,27.729 R86.1@190.67,27.729 ; v1(190.401,34.85) D1.4@191.201,34.85
  L6 w0.508: v2(158.8,83.533) 173.467,83.533 ; v1(170.4,17.3) v1(172.3,17.3) ; v1(175.302,31.06) 172.3,28.058 v1(172.3,17.3) ; v1(176.084,6.4) 176.084,10.216 172.3,14 v1(172.3,17.3) ; v1(177.8,31.06) 180.956,31.06 181.351,31.455 ; v1(181.351,33.305) 181.351,31.455 ; v1(190.401,34.85) 191.337,33.914 ; 196.654,76.246 197.9,75 197.9,67.346 194.586,64.032 194.586,33.914 ; J6.30@201.75,24.55 200.5,25.8 197.8,25.8 195.6,28 195.6,32.9 194.586,33.914 ; 181.351,31.455 185.345,31.455 189.071,27.729 190.129,27.729 192,29.6 192,33.251 191.337,33.914 ; 191.337,33.914 194.586,33.914
  other v1: 189.935,27.729
P5V0A: C16.2 C17.2 D12A.1 D12AA.1 D12AB.1 D12AC.1 D12AD.1 D12AE.1 D12AF.1 D12B.1 D12C.1 D12D.1 D12E.1 D12F.1 D12G.1 D12H.1 D12I.1 D12J.1 D12K.1 D12L.1 D12M.1 D12N.1 D12O.1 D12P.1 D12Q.1 D12R.1 D12S.1 D12T.1 D12U.1 D12V.1 D12W.1 D12X.1 D12Y.1 D12Z.1 D13A.1 D13AA.1 D13AB.1 D13AC.1 D13AD.1 D13AE.1 D13AF.1 D13B.1 D13C.1 D13D.1 D13E.1 D13F.1 D13G.1 D13H.1 D13I.1 D13J.1 D13K.1 D13L.1 D13M.1 D13N.1 D13O.1 D13P.1 D13Q.1 D13R.1 D13S.1 D13T.1 D13U.1 D13V.1 D13W.1 D13X.1 D13Y.1 D13Z.1 L2.2 R125.1 RL1A.3 RL1AA.3 RL1AB.3 RL1AC.3 RL1AD.3 RL1AE.3 RL1AF.3 RL1B.3 RL1C.3 RL1D.3 RL1E.3 RL1F.3 RL1G.3 RL1H.3 RL1I.3 RL1J.3 RL1K.3 RL1L.3 RL1M.3 RL1N.3 RL1O.3 RL1P.3 RL1Q.3 RL1R.3 RL1S.3 RL1T.3 RL1U.3 RL1V.3 RL1W.3 RL1X.3 RL1Y.3 RL1Z.3 RL2A.3 RL2AA.3 RL2AB.3 RL2AC.3 RL2AD.3 RL2AE.3 RL2AF.3 RL2B.3 RL2C.3 RL2D.3 RL2E.3 RL2F.3 RL2G.3 RL2H.3 RL2I.3 RL2J.3 RL2K.3 RL2L.3 RL2M.3 RL2N.3 RL2O.3 RL2P.3 RL2Q.3 RL2R.3 RL2S.3 RL2T.3 RL2U.3 RL2V.3 RL2W.3 RL2X.3 RL2Y.3 RL2Z.3 TP4.1 | length 1614.3
  L1 w0.3: v1@134.12,9.56 C17.2@134.669,9.56 ; v1@134.12,10.64 C17.2@134.669,10.64 ; v1@134.12,11.66 C16.2@134.669,11.66 ; v1@134.12,12.74 C16.2@134.669,12.74
  L1 w0.508: RL2AF.3@96.442,89.7 97.33,89.7 98.63,91 130.1,91 138.7,82.4 155.1,82.4 155.4,82.1 R125.1@155.4,81.1 TP4.1@157.6,81.1 ; 132.273,5.957 L2.2@133.773,5.957 ; 132.344,3.959 L2.2@133.844,3.959 ; 132.344,7.259 L2.2@133.844,7.259 ; 132.348,4.844 L2.2@133.848,4.844 ; 132.348,8.144 L2.2@133.848,8.144 ; L2.2@133.837,8.144 133.837,8.864 ; L2.2@134.913,7.869 134.913,8.869
  L6 w0.508: D12A.1@25.478,5.76 26.184,5.76 ; D13A.1@25.478,11.356 26.184,11.356 ; D12E.1@25.478,16.952 26.184,16.952 ; D13E.1@25.478,22.548 26.184,22.548 ; D12I.1@25.478,28.144 RL1I.3@33.934,28.144 34.785,28.144 36.145,26.784 46.4,26.784 47.02,27.404 47.02,28.144 ; D13I.1@25.478,33.74 RL2I.3@33.934,33.74 34.785,33.74 36.145,35.1 46.4,35.1 47.02,34.48 47.02,33.74 ; D12M.1@25.478,39.336 RL1M.3@33.934,39.336 34.785,39.336 36.145,37.976 46.4,37.976 47.02,38.596 47.02,39.336 ; D13M.1@25.478,44.932 RL2M.3@33.934,44.932 34.785,44.932 36.145,46.292 46.4,46.292 47.02,45.672 47.02,44.932 ; D12Q.1@25.478,50.528 RL1Q.3@33.934,50.528 34.785,50.528 36.145,49.168 46.4,49.168 47.02,49.788 47.02,50.528 ; D13Q.1@25.478,56.124 RL2Q.3@33.934,56.124 34.785,56.124 36.145,57.484 46.4,57.484 47.02,56.864 47.02,56.124 ; D12U.1@25.478,61.72 RL1U.3@33.934,61.72 34.785,61.72 36.145,60.36 46.4,60.36 47.02,60.98 47.02,61.72 ; D13U.1@25.478,67.316 RL2U.3@33.934,67.316 34.785,67.316 36.145,68.676 46.4,68.676 47.02,68.056 47.02,67.316 ; D12Y.1@25.478,72.912 RL1Y.3@33.934,72.912 34.785,72.912 36.145,71.552 46.4,71.552 47.02,72.172 47.02,72.912 ; D13Y.1@25.478,78.508 RL2Y.3@33.934,78.508 34.785,78.508 36.145,79.868 46.4,79.868 47.02,79.248 47.02,78.508 ; D12AC.1@25.478,84.104 RL1AC.3@33.934,84.104 34.785,84.104 36.145,82.744 46.4,82.744 47.02,83.364 47.02,84.104 ; D13AC.1@25.478,89.7 RL2AC.3@33.934,89.7 34.785,89.7 36.145,91.06 46.4,91.06 47.02,90.44 47.02,89.7 ; 26.184,28.144 26.184,27.404 25.564,26.784 16.8,26.784 ; 26.184,33.74 26.184,34.48 25.564,35.1 20.716,35.1 19.9,34.284 19.9,32.884 19.2,32.184 16.8,32.184 ; 26.184,39.336 26.184,38.596 25.564,37.976 16.8,37.976 ; 26.184,44.932 26.184,45.672 25.564,46.292 20.716,46.292 19.9,45.476 19.9,44.076 19.2,43.376 16.8,43.376 ; 26.184,50.528 26.184,49.788 25.564,49.168 16.8,49.168 ; 26.184,56.124 26.184,56.864 25.564,57.484 20.716,57.484 19.9,56.668 19.9,55.268 19.2,54.568 16.8,54.568 ; 26.184,61.72 26.184,60.98 25.564,60.36 16.8,60.36 ; 26.184,67.316 26.184,68.056 25.564,68.676 20.716,68.676 19.9,67.86 19.9,66.46 19.2,65.76 16.8,65.76 ; 26.184,72.912 26.184,72.172 25.564,71.552 16.8,71.552 ; 26.184,78.508 26.184,79.248 25.564,79.868 20.716,79.868 19.9,79.052 19.9,77.652 19.2,76.952 16.8,76.952 ; 26.184,84.104 26.184,83.364 25.564,82.744 16.8,82.744 ; 26.184,89.7 26.184,90.44 25.564,91.06 20.716,91.06 19.9,90.244 19.9,88.844 19.2,88.144 17.944,88.144 16.8,87 16.8,82.744 ; D12C.1@46.314,5.76 47.02,5.76 ; D13C.1@46.314,11.356 47.02,11.356 ; D12G.1@46.314,16.952 47.02,16.952 ; D13G.1@46.314,22.548 47.02,22.548 ; D12K.1@46.314,28.144 47.02,28.144 ; D13K.1@46.314,33.74 47.02,33.74 ; D12O.1@46.314,39.336 47.02,39.336 ; D13O.1@46.314,44.932 47.02,44.932 ; D12S.1@46.314,50.528 47.02,50.528 ; D13S.1@46.314,56.124 47.02,56.124 ; D12W.1@46.314,61.72 47.02,61.72 ; D13W.1@46.314,67.316 47.02,67.316 ; D12AA.1@46.314,72.912 47.02,72.912 ; D13AA.1@46.314,78.508 47.02,78.508 ; D12AE.1@46.314,84.104 47.02,84.104 ; D13AE.1@46.314,89.7 47.02,89.7 ; D12B.1@67.15,5.76 67.856,5.76 ; D13B.1@67.15,11.356 67.856,11.356 ; D12F.1@67.15,16.952 67.856,16.952 ; D13F.1@67.15,22.548 67.856,22.548 ; D12J.1@67.15,28.144 67.856,28.144 ; D13J.1@67.15,33.74 67.856,33.74 ; D12N.1@67.15,39.336 67.856,39.336 ; D13N.1@67.15,44.932 67.856,44.932 ; D12R.1@67.15,50.528 67.856,50.528 ; D13R.1@67.15,56.124 67.856,56.124 ; D12V.1@67.15,61.72 67.856,61.72 ; D13V.1@67.15,67.316 67.856,67.316 ; D12Z.1@67.15,72.912 67.856,72.912 ; D13Z.1@67.15,78.508 67.856,78.508 ; D12AD.1@67.15,84.104 67.856,84.104 ; D13AD.1@67.15,89.7 67.856,89.7 ; D12D.1@87.986,5.76 88.692,5.76 ; D13D.1@87.986,11.356 88.692,11.356 ; D12H.1@87.986,16.952 88.692,16.952 ; D13H.1@87.986,22.548 88.692,22.548 ; D12L.1@87.986,28.144 88.692,28.144 ; D13L.1@87.986,33.74 88.692,33.74 ; D12P.1@87.986,39.336 88.692,39.336 ; D13P.1@87.986,44.932 88.692,44.932 ; D12T.1@87.986,50.528 88.692,50.528 ; D13T.1@87.986,56.124 88.692,56.124 ; D12X.1@87.986,61.72 88.692,61.72 ; D13X.1@87.986,67.316 88.692,67.316 ; D12AB.1@87.986,72.912 88.692,72.912 ; D13AB.1@87.986,78.508 88.692,78.508 ; D12AF.1@87.986,84.104 88.692,84.104 ; D13AF.1@87.986,89.7 88.692,89.7 ; RL2D.3@96.442,11.356 88.692,11.356 ; RL1H.3@96.442,16.952 88.692,16.952 ; RL2H.3@96.442,22.548 88.692,22.548 ; RL1L.3@96.442,28.144 88.692,28.144 ; RL2L.3@96.442,33.74 88.692,33.74 ; RL1P.3@96.442,39.336 88.692,39.336 ; RL2P.3@96.442,44.932 88.692,44.932 ; RL1T.3@96.442,50.528 88.692,50.528 ; RL2T.3@96.442,56.124 88.692,56.124 ; RL1X.3@96.442,61.72 88.692,61.72 ; RL2X.3@96.442,67.316 88.692,67.316 ; RL1AB.3@96.442,72.912 88.692,72.912 ; RL2AB.3@96.442,78.508 88.692,78.508 ; RL1AF.3@96.442,84.104 88.692,84.104 ; RL2AF.3@96.442,89.7 88.692,89.7 ; 122.525,5.7 108.952,5.7 107.231,3.979 98.223,3.979 RL1D.3@96.442,5.76 88.692,5.76 ; 16.8,9.8 16.8,15.592 ; 16.8,9.8 16.8,5.4 17.8,4.4 25.564,4.4 26.184,5.02 26.184,5.76 ; 16.8,9.8 19.2,9.8 19.9,10.5 19.9,11.9 20.716,12.716 25.564,12.716 26.184,12.096 26.184,11.356 ; 16.8,15.592 25.564,15.592 26.184,16.212 26.184,16.952 ; 16.8,15.592 16.8,20.992 ; 16.8,20.992 16.8,26.784 ; 16.8,20.992 19.2,20.992 19.9,21.692 19.9,23.092 20.716,23.908 25.564,23.908 26.184,23.288 26.184,22.548 ; 16.8,26.784 16.8,32.184 ; 16.8,32.184 16.8,37.976 ; 16.8,37.976 16.8,43.376 ; 16.8,43.376 16.8,49.168 ; 16.8,49.168 16.8,54.568 ; 16.8,54.568 16.8,60.36 ; 16.8,60.36 16.8,65.76 ; 16.8,65.76 16.8,71.552 ; 16.8,71.552 16.8,76.952 ; 16.8,76.952 16.8,82.744 ; 26.184,5.76 RL1A.3@33.934,5.76 34.785,5.76 36.145,4.4 46.4,4.4 47.02,5.02 47.02,5.76 ; 26.184,11.356 RL2A.3@33.934,11.356 34.785,11.356 36.145,12.716 46.4,12.716 47.02,12.096 47.02,11.356 ; 26.184,16.952 RL1E.3@33.934,16.952 34.785,16.952 36.145,15.592 46.4,15.592 47.02,16.212 47.02,16.952 ; 26.184,22.548 RL2E.3@33.934,22.548 34.785,22.548 36.145,23.908 46.4,23.908 47.02,23.288 47.02,22.548 ; 47.02,5.76 RL1C.3@54.77,5.76 55.621,5.76 56.981,4.4 67.236,4.4 67.856,5.02 67.856,5.76 ; 47.02,11.356 RL2C.3@54.77,11.356 55.621,11.356 56.981,12.716 67.236,12.716 67.856,12.096 67.856,11.356 ; 47.02,16.952 RL1G.3@54.77,16.952 55.621,16.952 56.981,15.592 67.236,15.592 67.856,16.212 67.856,16.952 ; 47.02,22.548 RL2G.3@54.77,22.548 55.621,22.548 56.981,23.908 67.236,23.908 67.856,23.288 67.856,22.548 ; 47.02,28.144 RL1K.3@54.77,28.144 55.621,28.144 56.981,26.784 67.236,26.784 67.856,27.404 67.856,28.144 ; 47.02,33.74 RL2K.3@54.77,33.74 55.621,33.74 56.981,35.1 67.236,35.1 67.856,34.48 67.856,33.74 ; 47.02,39.336 RL1O.3@54.77,39.336 55.621,39.336 56.981,37.976 67.236,37.976 67.856,38.596 67.856,39.336 ; 47.02,44.932 RL2O.3@54.77,44.932 55.621,44.932 56.981,46.292 67.236,46.292 67.856,45.672 67.856,44.932 ; 47.02,50.528 RL1S.3@54.77,50.528 55.621,50.528 56.981,49.168 67.236,49.168 67.856,49.788 67.856,50.528 ; 47.02,56.124 RL2S.3@54.77,56.124 55.621,56.124 56.981,57.484 67.236,57.484 67.856,56.864 67.856,56.124 ; 47.02,61.72 RL1W.3@54.77,61.72 55.621,61.72 56.981,60.36 67.236,60.36 67.856,60.98 67.856,61.72 ; 47.02,67.316 RL2W.3@54.77,67.316 55.621,67.316 56.981,68.676 67.236,68.676 67.856,68.056 67.856,67.316 ; 47.02,72.912 RL1AA.3@54.77,72.912 55.621,72.912 56.981,71.552 67.236,71.552 67.856,72.172 67.856,72.912 ; 47.02,78.508 RL2AA.3@54.77,78.508 55.621,78.508 56.981,79.868 67.236,79.868 67.856,79.248 67.856,78.508 ; 47.02,84.104 RL1AE.3@54.77,84.104 55.621,84.104 56.981,82.744 67.236,82.744 67.856,83.364 67.856,84.104 ; 47.02,89.7 RL2AE.3@54.77,89.7 55.621,89.7 56.981,91.06 67.236,91.06 67.856,90.44 67.856,89.7 ; 67.856,5.76 RL1B.3@75.606,5.76 76.457,5.76 77.817,4.4 88.072,4.4 88.692,5.02 88.692,5.76 ; 67.856,11.356 RL2B.3@75.606,11.356 76.457,11.356 77.817,12.716 88.072,12.716 88.692,12.096 88.692,11.356 ; 67.856,16.952 RL1F.3@75.606,16.952 76.457,16.952 77.817,15.592 88.072,15.592 88.692,16.212 88.692,16.952 ; 67.856,22.548 RL2F.3@75.606,22.548 76.457,22.548 77.817,23.908 88.072,23.908 88.692,23.288 88.692,22.548 ; 67.856,28.144 RL1J.3@75.606,28.144 76.457,28.144 77.817,26.784 88.072,26.784 88.692,27.404 88.692,28.144 ; 67.856,33.74 RL2J.3@75.606,33.74 76.457,33.74 77.817,35.1 88.072,35.1 88.692,34.48 88.692,33.74 ; 67.856,39.336 RL1N.3@75.606,39.336 76.457,39.336 77.817,37.976 88.072,37.976 88.692,38.596 88.692,39.336 ; 67.856,44.932 RL2N.3@75.606,44.932 76.457,44.932 77.817,46.292 88.072,46.292 88.692,45.672 88.692,44.932 ; 67.856,50.528 RL1R.3@75.606,50.528 76.457,50.528 77.817,49.168 88.072,49.168 88.692,49.788 88.692,50.528 ; 67.856,56.124 RL2R.3@75.606,56.124 76.457,56.124 77.817,57.484 88.072,57.484 88.692,56.864 88.692,56.124 ; 67.856,61.72 RL1V.3@75.606,61.72 76.457,61.72 77.817,60.36 88.072,60.36 88.692,60.98 88.692,61.72 ; 67.856,67.316 RL2V.3@75.606,67.316 76.457,67.316 77.817,68.676 88.072,68.676 88.692,68.056 88.692,67.316 ; 67.856,72.912 RL1Z.3@75.606,72.912 76.457,72.912 77.817,71.552 88.072,71.552 88.692,72.172 88.692,72.912 ; 67.856,78.508 RL2Z.3@75.606,78.508 76.457,78.508 77.817,79.868 88.072,79.868 88.692,79.248 88.692,78.508 ; 67.856,84.104 RL1AD.3@75.606,84.104 76.457,84.104 77.817,82.744 88.072,82.744 88.692,83.364 88.692,84.104 ; 67.856,89.7 RL2AD.3@75.606,89.7 76.457,89.7 77.817,91.06 88.072,91.06 88.692,90.44 88.692,89.7
  other v1: 133.005,9.56 134.085,9.56 133.005,10.64 134.085,10.64 133.005,11.66 134.085,11.66 133.005,12.74 134.085,12.74
P12V0: C12.2 C15.2 C29.2 C31.2 C40.2 C93.2 C123.2 D10.1 IC14.1 IC14.3 IC19.1 IC19.8 IC20.2 IC20.3 IC22.3 J6.28 J6.29 J10.3 J10.4 J13.A1 J13.D1 J13.E1 J13.G1 J13.H1 J13.J1 J13.K1 R20.1 R72.2 R87.2 R121.2 TP7.1 | length 259.1
  L1 w0.254: C31.2@149.02,9.58 C31.2@149.3,9.3
  L1 w0.3: R121.2@147.95,16.4 147.95,17.209 148.126,17.385 153.738,17.385 156,15.123 156,5.3 ; C29.2@148.592,7.421 IC19.1@148.592,5.325 148.592,3.658 148.866,3.385 ; C31.2@149.02,9.22 149.02,9.58 IC20.2@149.02,10.75 ; C31.2@149.3,9.167 149.467,9.167 149.52,9.22 IC20.3@149.52,10.75 ; C31.2@149.445,9.069 149.506,9.069 149.625,8.95 149.625,8.89 149.772,8.743 149.772,8.337 ; IC19.8@149.814,4.57 149.814,3.686 150.1,3.4 154,3.4 154.5,3.9 154.5,4.9 154,5.4 153,5.4 152.775,5.625 ; 151.995,6.16 C12.2@152.544,6.16 ; 151.995,7.24 C12.2@152.495,7.24 ; 151.995,8.06 C15.2@152.495,8.06 ; C12.2@152.495,7.15 C12.2@152.495,7.24 ; C15.2@152.495,8.32 C15.2@152.495,8.06 ; C12.2@152.544,7.24 C12.2@152.495,7.24 ; C15.2@152.544,8.06 C15.2@152.495,8.06 ; C12.2@152.775,6.366 C12.2@152.775,6.7 ; C12.2@153.006,6.16 153.555,6.16 ; C12.2@153.006,7.24 C12.2@153.095,7.24 ; C15.2@153.006,8.06 C15.2@153.095,8.06 ; C15.2@153.006,9.14 153.555,9.14 ; C12.2@153.095,7.15 C12.2@153.095,7.24 ; C15.2@153.095,8.68 C15.2@153.095,8.06 ; 153.555,7.24 C12.2@153.095,7.24 ; 153.555,8.06 C15.2@153.095,8.06 ; C12.2@152.495,7.24 C15.2@152.495,8.06 ; C12.2@153.095,7.24 C15.2@153.095,8.06
  L1 w0.45: 192.685,3.9 D10.1@193.6,3.9 ; 192.69,3.102 D10.1@193.605,3.102 ; 192.69,4.698 D10.1@193.605,4.698 ; D10.1@193.453,4.747 D10.1@193.453,4.947 ; D10.1@194.2,4.2 D10.1@193.453,4.947 ; D10.1@194.795,3.102 195.71,3.102 ; D10.1@194.795,4.698 195.71,4.698 ; D10.1@194.8,3.9 195.715,3.9 ; IC14.3@195.15,12.2 195.146,12.204 195.146,13.1 194.882,13.364 193.518,13.364 193.254,13.1 193.254,12.204 IC14.1@193.25,12.2 193.25,10.75 C40.2@193.4,10.6 193.4,10.575 192.577,9.752 192.577,6.409 193.453,5.533 D10.1@193.453,4.947
  L1 w0.5: C29.2@148.892,7.735 149.636,7.735 ; C29.2@149.1,8.156 C31.2@149.1,8.9 ; 150.256,7.5 R72.2@151,7.5 ; 151,8.244 R72.2@151,7.5 ; 151.744,7.5 R72.2@151,7.5 ; 152.775,5.625 C12.2@152.775,6.366 ; 164.994,80.094 169.2,84.3 218.6,84.3 ; J10.3@200.9,72.9 203.3,75.3 214.8,75.3 218.6,79.1 218.6,84.3 ; R87.2@215.4,96.6 215.4,95.1 218.6,91.9 218.6,84.3
  L1 w0.508: R20.1@155.4,78.667 TP7.1@157.6,78.667 163.567,78.667 164.994,80.094 ; C123.2@167.738,6.144 C93.2@167.738,7.793 ; 167.838,4.9 C123.2@167.838,6.008 ; C93.2@167.888,7.833 IC22.3@167.888,9.482 ; J6.29@199.2,24.54 J6.29@199.21,24.55
  L1 w1.27: J10.4@200.9,68.7 J10.3@200.9,72.9
  L6 w1.27: 199.049,6.292 199.049,22.339 199.21,22.5 ; J6.29@199.21,24.55 199.21,22.5 ; J10.3@200.9,72.9 J10.4@200.9,68.7 200.9,66.6 204.6,62.9 204.6,28.4 ; J6.28@201.75,27.09 201.813,27.153 203.353,27.153 204.6,28.4 ; 199.21,22.5 203.6,22.5 204.6,23.5 204.6,28.4
P13V0_SCSI: J1.18 J4.25 J5.25 J7.25 J8.25 | length 155.1
  L1 w0.762: 110.534,86.796 J7.25@109.057,86.796 109.057,88.272 109.785,89 121.878,89 122.557,88.321 J5.25@122.557,86.796 124.504,86.796 125.9,85.4 125.9,54 122.557,50.657 J4.25@122.557,45.796 124.704,45.796 125.7,44.8 125.7,25.3 129.5,21.5 133.3,21.5
  L5 w0.762: J1.18@6.894,43.441 9.159,43.441 10.177,42.423 10.177,8.423 15.2,3.4
  L6 w0.508: J8.25@109.057,45.796 110.354,44.5 121.261,44.5 J4.25@122.557,45.796
  other v2: 132.346,20.146 133.7,20.146 135.054,20.146 132.346,21.5 133.7,21.5 135.054,21.5 132.346,22.854 133.7,22.854 135.054,22.854 133.7,24.209 135.054,24.209
PORT_NA: J9.1 R94.2 RL1A.1 RL1AA.1 RL1AB.1 RL1AC.1 RL1AD.1 RL1AE.1 RL1AF.1 RL1B.1 RL1C.1 RL1D.1 RL1E.1 RL1F.1 RL1G.1 RL1H.1 RL1I.1 RL1J.1 RL1K.1 RL1L.1 RL1M.1 RL1N.1 RL1O.1 RL1P.1 RL1Q.1 RL1R.1 RL1S.1 RL1T.1 RL1U.1 RL1V.1 RL1W.1 RL1X.1 RL1Y.1 RL1Z.1 | length 679.3
  L5 w0.152: J9.1@10.5,79.1 13.867,79.1 15.684,77.283 15.684,8.016 17.94,5.76 RL1A.1@18.694,5.76 19.348,5.76 19.823,6.235 ; RL1AC.1@18.694,84.104 19.348,84.104 19.823,83.629 19.823,83.174 ; RL1D.1@81.202,5.76 79.26,5.76 78.5,5 75.268,5 74.568,5.7 63.92,5.7 63.22,5 62.6,5 61.84,5.76 RL1B.1@60.366,5.76 58.36,5.76 57.6,5 54.4,5 53.8,5.6 43,5.6 42.438,5.038 41.662,5.038 40.94,5.76 RL1C.1@39.53,5.76 37.56,5.76 36.823,5.023 36.177,5.023 34.6,6.6 20.9,6.6 20.535,6.235 19.823,6.235 ; RL1H.1@81.202,16.952 80.05,15.8 61.518,15.8 RL1F.1@60.366,16.952 59.214,15.8 40.682,15.8 RL1G.1@39.53,16.952 38.6,16.022 19.823,16.022 ; RL1L.1@81.202,28.144 80.05,26.992 61.518,26.992 RL1J.1@60.366,28.144 59.214,26.992 40.682,26.992 RL1K.1@39.53,28.144 38.6,27.214 19.823,27.214 ; RL1P.1@81.202,39.336 80.05,38.184 61.518,38.184 RL1N.1@60.366,39.336 59.214,38.184 40.682,38.184 RL1O.1@39.53,39.336 38.6,38.406 19.823,38.406 ; RL1T.1@81.202,50.528 80.05,49.376 61.518,49.376 RL1R.1@60.366,50.528 59.214,49.376 40.682,49.376 RL1S.1@39.53,50.528 38.6,49.598 19.823,49.598 ; RL1X.1@81.202,61.72 80.05,60.568 61.518,60.568 RL1V.1@60.366,61.72 59.214,60.568 40.682,60.568 RL1W.1@39.53,61.72 38.6,60.79 19.823,60.79 ; RL1AB.1@81.202,72.912 80.05,71.76 61.518,71.76 RL1Z.1@60.366,72.912 59.214,71.76 40.682,71.76 RL1AA.1@39.53,72.912 38.6,71.982 19.823,71.982 ; RL1AF.1@81.202,84.104 80.05,82.952 61.518,82.952 RL1AD.1@60.366,84.104 59.214,82.952 40.682,82.952 RL1AE.1@39.53,84.104 38.6,83.174 19.823,83.174 ; 19.823,6.235 19.823,16.022 ; 19.823,16.022 19.823,16.477 19.348,16.952 RL1E.1@18.694,16.952 19.823,18.081 19.823,27.214 ; 19.823,27.214 19.823,27.669 19.348,28.144 RL1I.1@18.694,28.144 19.823,29.273 19.823,38.406 ; 19.823,38.406 19.823,38.861 19.348,39.336 RL1M.1@18.694,39.336 19.823,40.465 19.823,49.598 ; 19.823,49.598 19.823,50.053 19.348,50.528 RL1Q.1@18.694,50.528 19.823,51.657 19.823,60.79 ; 19.823,60.79 19.823,61.245 19.348,61.72 RL1U.1@18.694,61.72 19.823,62.849 19.823,71.982 ; 19.823,71.982 19.823,72.437 19.348,72.912 RL1Y.1@18.694,72.912 19.823,74.041 19.823,83.174
  L6 w0.152: J9.1@10.5,79.1 R94.2@10.5,80.8